# Altium PCB Deck Versal.PcbDoc
Units mm, origin at the board's own origin, x right, y up, seen from the top; angles counter-clockwise.
Board outline 314.32 x 139.7 mm, 2 copper layers (Top Layer, Bottom Layer); 181 components, 112 nets, 1109 pads, 0 vias.
Unrouted connection lines stored in the file: 21.
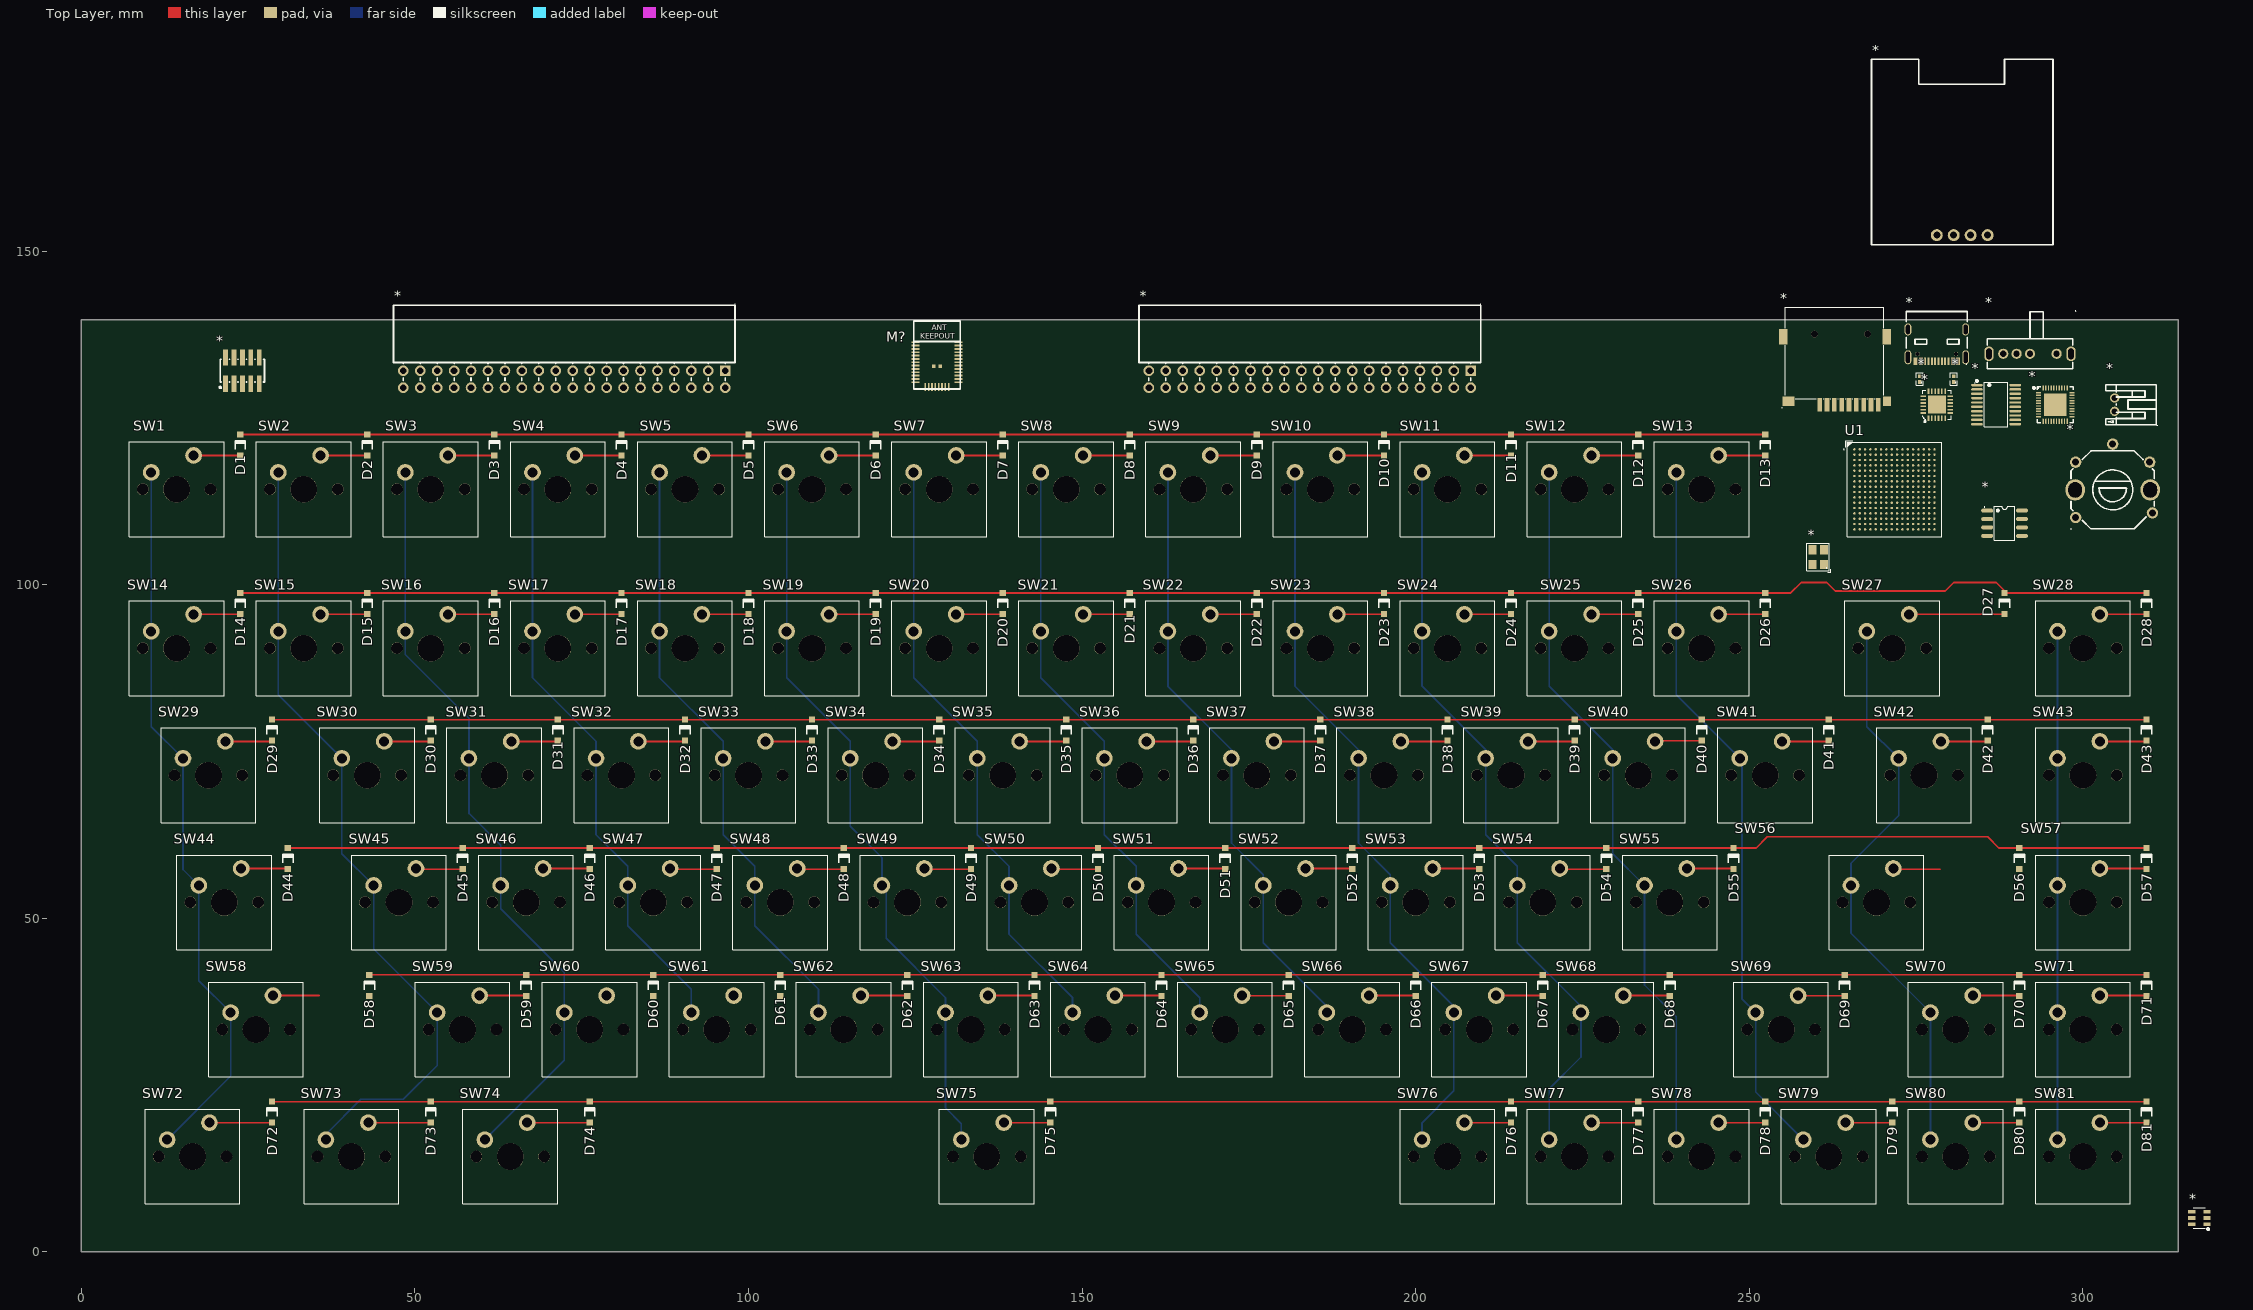
[diagram p0: Top Layer view]
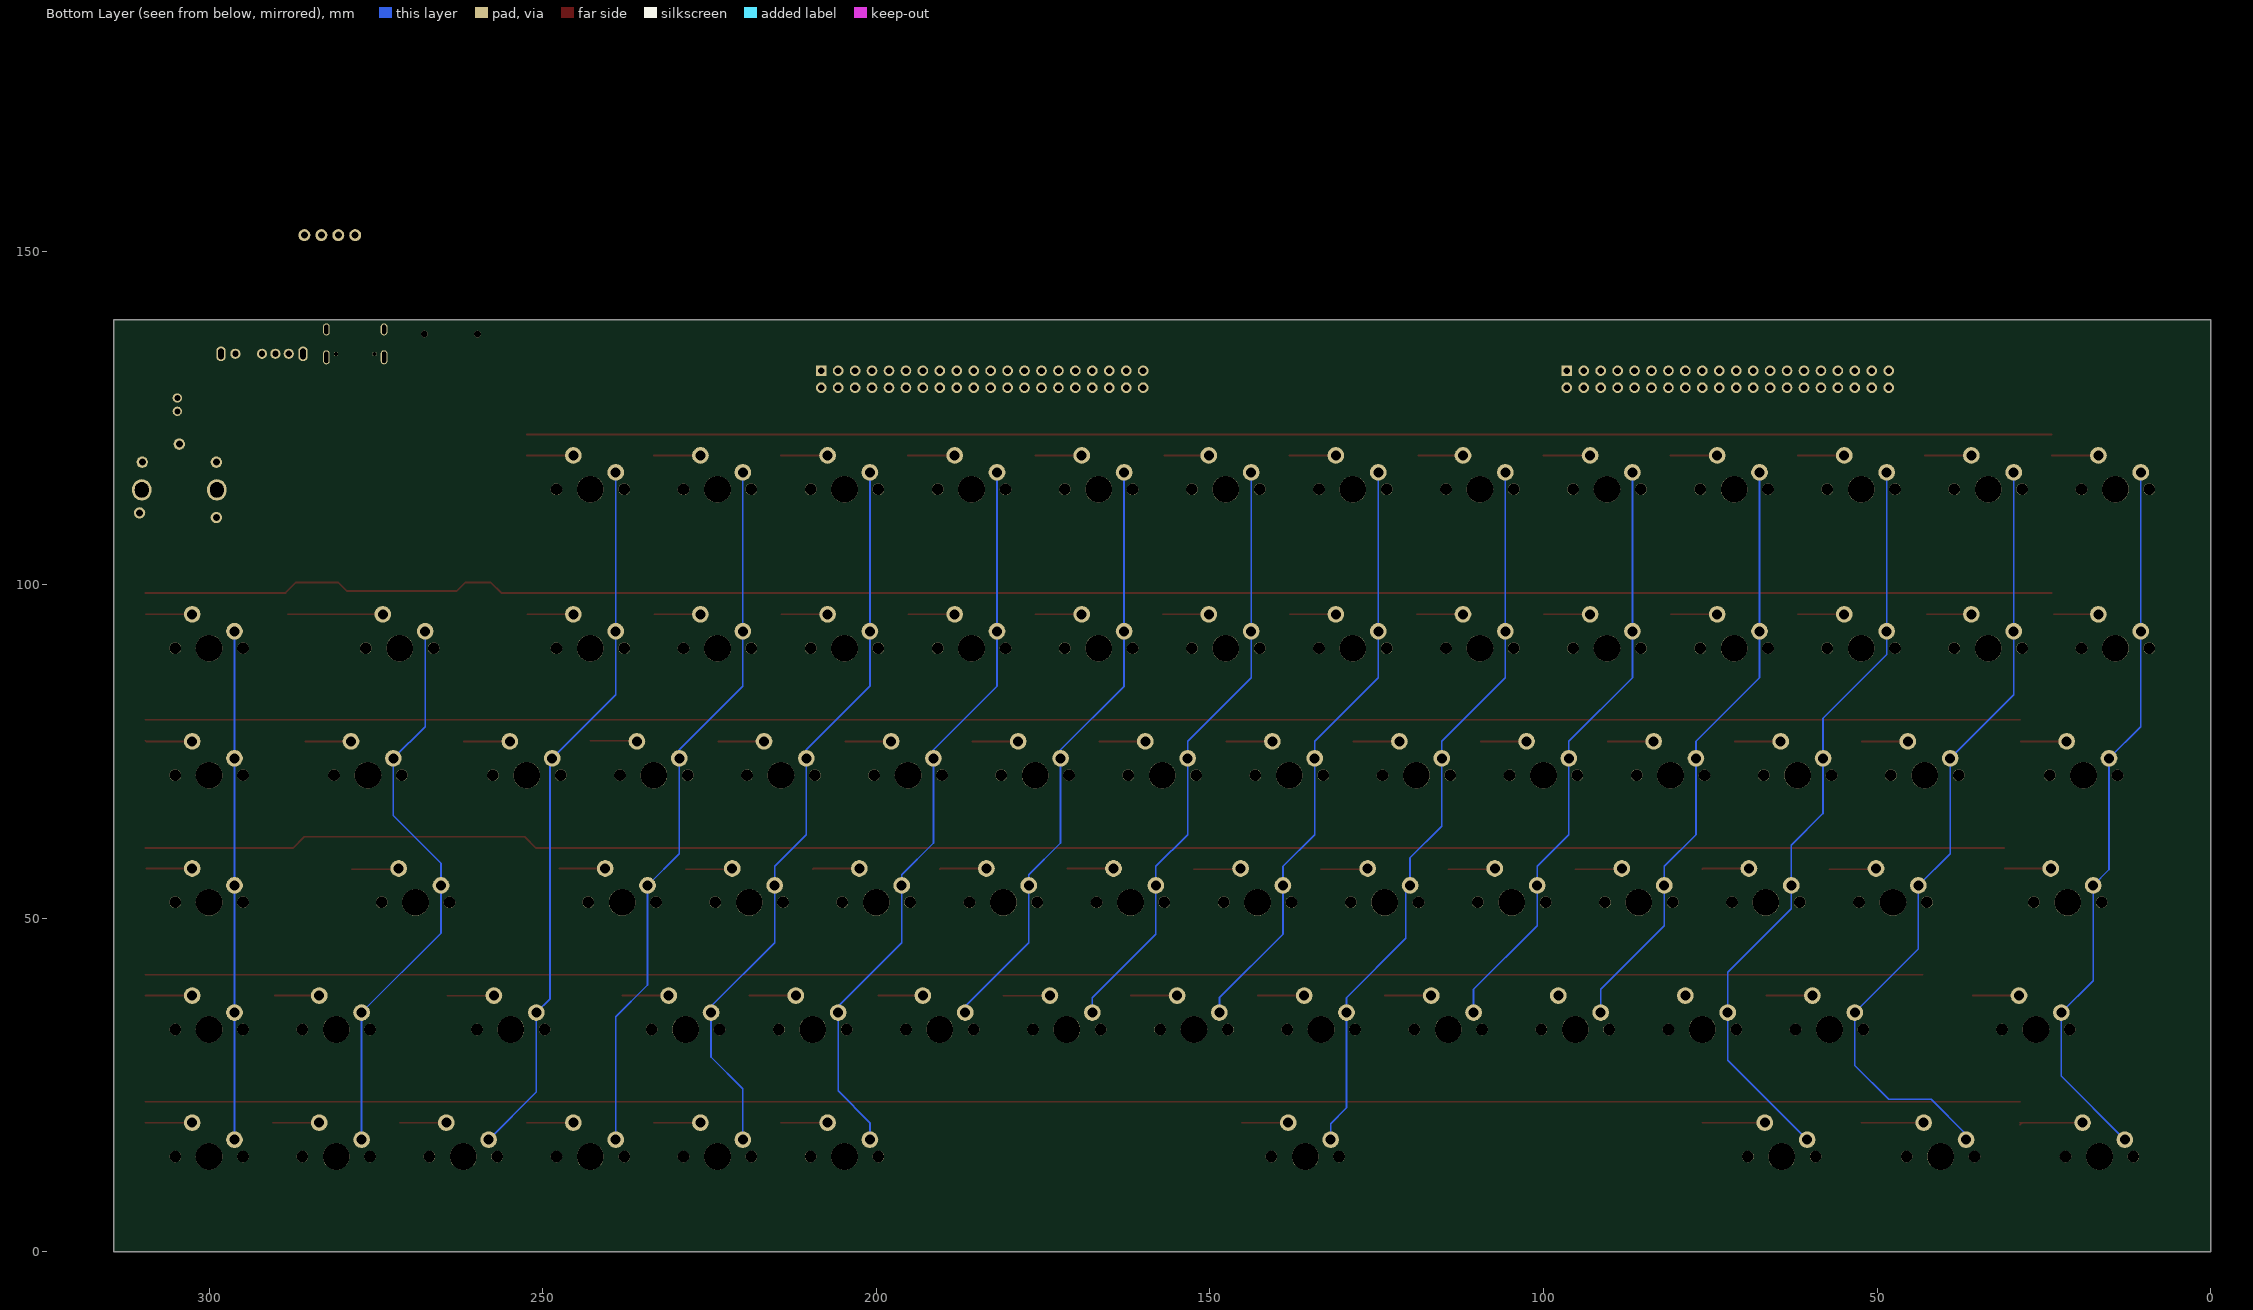
[diagram p1: Bottom Layer view, seen from below]

## Layer stack, top to bottom
Top Solder: solder mask 0.0102, Solder Resist, Dk 3.5
Top Layer: signal copper 0.0356
Dielectric 1: dielectric 0.32, FR-4, Dk 4.8
Bottom Layer: signal copper 0.0356
Bottom Solder: solder mask 0.0102, Solder Resist, Dk 3.5

## Board outline
0,0 314.325,0 314.325,139.7 0,139.7

## Design rules (kind name [scope] priority, off if disabled: settings)
Clearance [All] p1: gap=0.254 ignorepadtopadclearanceinfootprint=FALSE
PolygonConnect [All] p1: connectstyle=Relief reliefconductorwidth=0.254 reliefentries=4 polygonreliefangle="90 Angle" airgapwidth=0.254
RoutingVias [All] p1: holewidth=0.711 width=1.27 viastyle="Through Hole" minholewidth=0.711 minwidth=1.27 maxholewidth=0.711 maxwidth=1.27
SolderMaskExpansion [All] p1: expansion=0.102 istentingtop=FALSE
SupplyNets "Schematic Supply Nets_2" [InNet('VBUS')] p1: voltage=0.000
SupplyNets "Schematic Supply Nets_1" [InNet('GND')] p2: voltage=0.000
SupplyNets "Schematic Supply Nets" [InNet('VBUS_RAW')] p3: voltage=0.000
Width [All] p1: maxlimit=0.254 minlimit=0.254 preferedwidth=0.254
30 further rules are at their usual default settings.

## Classes and differential pairs
component class Memory: *
component class Power: *
component class Peripherals: * M?
component class "Deck Versal": * U1
component class USB: *
component class Keyboard: D1 D2 D3 D4 D5 D6 D7 D8 D9 D10 D11 D12 D13 D14 D15 D16 D17 D18 D19 D20 D21 D22 D23 D24 D25 D26 D27 D28 D29 D30 D31 D32 D33 D34 D35 D36 D37 D38 D39 D40 D41 D42 D43 D44 D45 D46 D47 D48 D49 D50 D51 D52 D53 D54 D55 D56 D57 D58 D59 D60 D61 D62 D63 D64 D65 D66 D67 D68 D69 D70 D71 D72 D73 D74 D75 D76 D77 D78 D79 D80 D81 SW1 SW2 SW3 SW4 SW5 SW6 SW7 SW8 SW9 SW10 SW11 SW12 SW13 SW14 SW15 SW16 SW17 SW18 SW19 SW20 SW21 SW22 SW23 SW24 SW25 SW26 SW27 SW28 SW29 SW30 SW31 SW32 SW33 SW34 SW35 SW36 SW37 SW38 SW39 SW40 SW41 SW42 SW43 SW44 SW45 SW46 SW47 SW48 SW49 SW50 SW51 SW52 SW53 SW54 SW55 SW56 SW57 SW58 SW59 SW60 SW61 SW62 SW63 SW64 SW65 SW66 SW67 SW68 SW69 SW70 SW71 SW72 SW73 SW74 SW75 SW76 SW77 SW78 SW79 SW80 SW81

## Components (designator, comment, footprint, x,y, rotation, side; value= is the part's Value field where it differs from the comment)
* "HS96L03W2C03" OLED-TH_L27.8-W27.2-P2.54_C9900033791 281.94,152.4 r180 top
* "USBLC6-2SC6" SOT-23-6_L2.9-W1.6-P0.95-LS2.8-BL 317.5,5.08 r90 top
* "0402WGF5101TCE" R0402 280.67,130.826 r90 top
* "0402WGF5101TCE" R0402 275.59,130.826 r90 top
* "ZX-PM2.54-2-20PWS" HDR-TH_40P-P2.54-H-F-R2-C20-S2.54-W8.5_1 72.39,130.81 r180 top
* "ZX-PM2.54-2-20PWS" HDR-TH_40P-P2.54-H-F-R2-C20-S2.54-W8.5_1 184.15,130.81 r180 top
* "X1321WVS-2X05J-C40D53" HDR-SMD_10P-P1.27-V-M-C2-C5-LS5.3 24.13,132.08 r0 top
* "SK13D07VG4" SW-TH_SK13D07VG4 292.1,134.62 r180 top
* "USB4105-GF-A-120" USB-C-SMD_MC-311D 278.13,135.89 r180 top
* "FE1.1S-BQFN24B" WQFN-24_L4.0-W4.0-P0.50-TL-EP2.7 278.13,127 r90 top
* "CH347T" TSSOP-20_L6.5-W4.4-P0.65-LS6.4-BL 287.02,127 r270 top
* "S2B-PH-K-S-GW" CONN-TH_S2B-PH-K-S-GW 304.8,127 r270 top
* "AXP2101" QFN-40_L5.0-W5.0-P0.40-TL-EP3.4 295.887,127 r0 top
* "EC12D1524403" SW-TH_EC12D1524403 304.663,115.57 r0 top
* "TF-015" TF-SMD_TF-015 262.89,132.08 r180 top
* "APS6404L-3SQR-SN_C5333729" SOIC-8_L4.9-W3.9-P1.27-LS6.0-BL 288.29,109.22 r270 top
* "1532H4-12000JWPDTSNL" OSC-SMD_4P-L3.2-W2.5-BL 260.35,104.14 r90 top
D1 "1N4148W-7-F" DIOD-SOD123-2_V 23.812,120.95 r90 top
D2 "1N4148W-7-F" DIOD-SOD123-2_V 42.862,120.95 r90 top
D3 "1N4148W-7-F" DIOD-SOD123-2_V 61.912,120.95 r90 top
D4 "1N4148W-7-F" DIOD-SOD123-2_V 80.962,120.95 r90 top
D5 "1N4148W-7-F" DIOD-SOD123-2_V 100.013,120.95 r90 top
D6 "1N4148W-7-F" DIOD-SOD123-2_V 119.062,120.95 r90 top
D7 "1N4148W-7-F" DIOD-SOD123-2_V 138.112,120.95 r90 top
D8 "1N4148W-7-F" DIOD-SOD123-2_V 157.162,120.95 r90 top
D9 "1N4148W-7-F" DIOD-SOD123-2_V 176.213,120.95 r90 top
D10 "1N4148W-7-F" DIOD-SOD123-2_V 195.262,120.95 r90 top
D11 "1N4148W-7-F" DIOD-SOD123-2_V 214.312,120.95 r90 top
D12 "1N4148W-7-F" DIOD-SOD123-2_V 233.362,120.95 r90 top
D13 "1N4148W-7-F" DIOD-SOD123-2_V 252.412,120.95 r90 top
D14 "1N4148W-7-F" DIOD-SOD123-2_V 23.812,97.2 r90 top
D15 "1N4148W-7-F" DIOD-SOD123-2_V 42.862,97.2 r90 top
D16 "1N4148W-7-F" DIOD-SOD123-2_V 61.912,97.2 r90 top
D17 "1N4148W-7-F" DIOD-SOD123-2_V 80.962,97.2 r90 top
D18 "1N4148W-7-F" DIOD-SOD123-2_V 100.013,97.2 r90 top
D19 "1N4148W-7-F" DIOD-SOD123-2_V 119.062,97.2 r90 top
D20 "1N4148W-7-F" DIOD-SOD123-2_V 138.112,97.2 r90 top
D21 "1N4148W-7-F" DIOD-SOD123-2_V 157.162,97.2 r90 top
D22 "1N4148W-7-F" DIOD-SOD123-2_V 176.213,97.2 r90 top
D23 "1N4148W-7-F" DIOD-SOD123-2_V 195.262,97.2 r90 top
D24 "1N4148W-7-F" DIOD-SOD123-2_V 214.312,97.2 r90 top
D25 "1N4148W-7-F" DIOD-SOD123-2_V 233.362,97.2 r90 top
D26 "1N4148W-7-F" DIOD-SOD123-2_V 252.412,97.2 r90 top
D27 "1N4148W-7-F" DIOD-SOD123-2_V 288.29,97.2 r90 top
D28 "1N4148W-7-F" DIOD-SOD123-2_V 309.562,97.2 r90 top
D29 "1N4148W-7-F" DIOD-SOD123-2_V 28.575,78.2 r90 top
D30 "1N4148W-7-F" DIOD-SOD123-2_V 52.387,78.2 r90 top
D31 "1N4148W-7-F" DIOD-SOD123-2_V 71.438,78.2 r90 top
D32 "1N4148W-7-F" DIOD-SOD123-2_V 90.487,78.2 r90 top
D33 "1N4148W-7-F" DIOD-SOD123-2_V 109.537,78.2 r90 top
D34 "1N4148W-7-F" DIOD-SOD123-2_V 128.588,78.2 r90 top
D35 "1N4148W-7-F" DIOD-SOD123-2_V 147.637,78.2 r90 top
D36 "1N4148W-7-F" DIOD-SOD123-2_V 166.688,78.2 r90 top
D37 "1N4148W-7-F" DIOD-SOD123-2_V 185.737,78.2 r90 top
D38 "1N4148W-7-F" DIOD-SOD123-2_V 204.787,78.2 r90 top
D39 "1N4148W-7-F" DIOD-SOD123-2_V 223.837,78.2 r90 top
D40 "1N4148W-7-F" DIOD-SOD123-2_V 242.887,78.2 r90 top
D41 "1N4148W-7-F" DIOD-SOD123-2_V 261.938,78.2 r90 top
D42 "1N4148W-7-F" DIOD-SOD123-2_V 285.75,78.2 r90 top
D43 "1N4148W-7-F" DIOD-SOD123-2_V 309.562,78.2 r90 top
D44 "1N4148W-7-F" DIOD-SOD123-2_V 30.956,58.95 r90 top
D45 "1N4148W-7-F" DIOD-SOD123-2_V 57.15,58.95 r90 top
D46 "1N4148W-7-F" DIOD-SOD123-2_V 76.2,58.95 r90 top
D47 "1N4148W-7-F" DIOD-SOD123-2_V 95.25,58.95 r90 top
D48 "1N4148W-7-F" DIOD-SOD123-2_V 114.3,58.95 r90 top
D49 "1N4148W-7-F" DIOD-SOD123-2_V 133.35,58.95 r90 top
D50 "1N4148W-7-F" DIOD-SOD123-2_V 152.4,58.95 r90 top
D51 "1N4148W-7-F" DIOD-SOD123-2_V 171.45,58.95 r90 top
D52 "1N4148W-7-F" DIOD-SOD123-2_V 190.5,58.95 r90 top
D53 "1N4148W-7-F" DIOD-SOD123-2_V 209.55,58.95 r90 top
D54 "1N4148W-7-F" DIOD-SOD123-2_V 228.6,58.95 r90 top
D55 "1N4148W-7-F" DIOD-SOD123-2_V 247.65,58.95 r90 top
D56 "1N4148W-7-F" DIOD-SOD123-2_V 290.514,58.95 r90 top
D57 "1N4148W-7-F" DIOD-SOD123-2_V 309.562,58.95 r90 top
D58 "1N4148W-7-F" DIOD-SOD123-2_V 43.18,39.95 r90 top
D59 "1N4148W-7-F" DIOD-SOD123-2_V 66.675,39.95 r90 top
D60 "1N4148W-7-F" DIOD-SOD123-2_V 85.725,39.95 r90 top
D61 "1N4148W-7-F" DIOD-SOD123-2_V 104.775,39.95 r90 top
D62 "1N4148W-7-F" DIOD-SOD123-2_V 123.825,39.95 r90 top
D63 "1N4148W-7-F" DIOD-SOD123-2_V 142.875,39.95 r90 top
D64 "1N4148W-7-F" DIOD-SOD123-2_V 161.925,39.95 r90 top
D65 "1N4148W-7-F" DIOD-SOD123-2_V 180.975,39.95 r90 top
D66 "1N4148W-7-F" DIOD-SOD123-2_V 200.025,39.95 r90 top
D67 "1N4148W-7-F" DIOD-SOD123-2_V 219.075,39.95 r90 top
D68 "1N4148W-7-F" DIOD-SOD123-2_V 238.125,39.95 r90 top
D69 "1N4148W-7-F" DIOD-SOD123-2_V 264.319,39.95 r90 top
D70 "1N4148W-7-F" DIOD-SOD123-2_V 290.512,39.95 r90 top
D71 "1N4148W-7-F" DIOD-SOD123-2_V 309.562,39.95 r90 top
D72 "1N4148W-7-F" DIOD-SOD123-2_V 28.575,20.95 r90 top
D73 "1N4148W-7-F" DIOD-SOD123-2_V 52.387,20.95 r90 top
D74 "1N4148W-7-F" DIOD-SOD123-2_V 76.2,20.95 r90 top
D75 "1N4148W-7-F" DIOD-SOD123-2_V 145.256,20.95 r90 top
D76 "1N4148W-7-F" DIOD-SOD123-2_V 214.312,20.95 r90 top
D77 "1N4148W-7-F" DIOD-SOD123-2_V 233.362,20.95 r90 top
D78 "1N4148W-7-F" DIOD-SOD123-2_V 252.412,20.95 r90 top
D79 "1N4148W-7-F" DIOD-SOD123-2_V 271.462,20.95 r90 top
D80 "1N4148W-7-F" DIOD-SOD123-2_V 290.512,20.95 r90 top
D81 "1N4148W-7-F" DIOD-SOD123-2_V 309.562,20.95 r90 top
M? "BLYSTL15" BLYSTL15 128.27,133.35 r270 top
SW1 "Outemu_Switch" SW_Cherry_MX_PCB_1.00u 14.287,114.3 r0 top
SW2 "Outemu_Switch" SW_Cherry_MX_PCB_1.00u 33.337,114.3 r0 top
SW3 "Outemu_Switch" SW_Cherry_MX_PCB_1.00u 52.387,114.3 r0 top
SW4 "Outemu_Switch" SW_Cherry_MX_PCB_1.00u 71.438,114.3 r0 top
SW5 "Outemu_Switch" SW_Cherry_MX_PCB_1.00u 90.487,114.3 r0 top
SW6 "Outemu_Switch" SW_Cherry_MX_PCB_1.00u 109.537,114.3 r0 top
SW7 "Outemu_Switch" SW_Cherry_MX_PCB_1.00u 128.588,114.3 r0 top
SW8 "Outemu_Switch" SW_Cherry_MX_PCB_1.00u 147.637,114.3 r0 top
SW9 "Outemu_Switch" SW_Cherry_MX_PCB_1.00u 166.688,114.3 r0 top
SW10 "Outemu_Switch" SW_Cherry_MX_PCB_1.00u 185.737,114.3 r0 top
SW11 "Outemu_Switch" SW_Cherry_MX_PCB_1.00u 204.787,114.3 r0 top
SW12 "Outemu_Switch" SW_Cherry_MX_PCB_1.00u 223.837,114.3 r0 top
SW13 "Outemu_Switch" SW_Cherry_MX_PCB_1.00u 242.887,114.3 r0 top
SW14 "Outemu_Switch" SW_Cherry_MX_PCB_1.00u 14.287,90.487 r0 top
SW15 "Outemu_Switch" SW_Cherry_MX_PCB_1.00u 33.337,90.487 r0 top
SW16 "Outemu_Switch" SW_Cherry_MX_PCB_1.00u 52.387,90.487 r0 top
SW17 "Outemu_Switch" SW_Cherry_MX_PCB_1.00u 71.438,90.487 r0 top
SW18 "Outemu_Switch" SW_Cherry_MX_PCB_1.00u 90.487,90.487 r0 top
SW19 "Outemu_Switch" SW_Cherry_MX_PCB_1.00u 109.537,90.487 r0 top
SW20 "Outemu_Switch" SW_Cherry_MX_PCB_1.00u 128.588,90.487 r0 top
SW21 "Outemu_Switch" SW_Cherry_MX_PCB_1.00u 147.637,90.487 r0 top
SW22 "Outemu_Switch" SW_Cherry_MX_PCB_1.00u 166.688,90.487 r0 top
SW23 "Outemu_Switch" SW_Cherry_MX_PCB_1.00u 185.737,90.487 r0 top
SW24 "Outemu_Switch" SW_Cherry_MX_PCB_1.00u 204.787,90.487 r0 top
SW25 "Outemu_Switch" SW_Cherry_MX_PCB_1.00u 223.837,90.487 r0 top
SW26 "Outemu_Switch" SW_Cherry_MX_PCB_1.00u 242.887,90.487 r0 top
SW27 "Outemu_Switch" SW_Cherry_MX_PCB_1.00u 271.462,90.487 r0 top
SW28 "Outemu_Switch" SW_Cherry_MX_PCB_1.00u 300.037,90.487 r0 top
SW29 "Outemu_Switch" SW_Cherry_MX_PCB_1.00u 19.05,71.438 r0 top
SW30 "Outemu_Switch" SW_Cherry_MX_PCB_1.00u 42.862,71.438 r0 top
SW31 "Outemu_Switch" SW_Cherry_MX_PCB_1.00u 61.912,71.438 r0 top
SW32 "Outemu_Switch" SW_Cherry_MX_PCB_1.00u 80.962,71.438 r0 top
SW33 "Outemu_Switch" SW_Cherry_MX_PCB_1.00u 100.013,71.438 r0 top
SW34 "Outemu_Switch" SW_Cherry_MX_PCB_1.00u 119.062,71.438 r0 top
SW35 "Outemu_Switch" SW_Cherry_MX_PCB_1.00u 138.112,71.438 r0 top
SW36 "Outemu_Switch" SW_Cherry_MX_PCB_1.00u 157.162,71.438 r0 top
SW37 "Outemu_Switch" SW_Cherry_MX_PCB_1.00u 176.213,71.438 r0 top
SW38 "Outemu_Switch" SW_Cherry_MX_PCB_1.00u 195.262,71.438 r0 top
SW39 "Outemu_Switch" SW_Cherry_MX_PCB_1.00u 214.312,71.438 r0 top
SW40 "Outemu_Switch" SW_Cherry_MX_PCB_1.00u 233.362,71.438 r0 top
SW41 "Outemu_Switch" SW_Cherry_MX_PCB_1.00u 252.412,71.438 r0 top
SW42 "Outemu_Switch" SW_Cherry_MX_PCB_1.00u 276.225,71.438 r0 top
SW43 "Outemu_Switch" SW_Cherry_MX_PCB_1.00u 300.037,71.438 r0 top
SW44 "Outemu_Switch" SW_Cherry_MX_PCB_1.00u 21.431,52.387 r0 top
SW45 "Outemu_Switch" SW_Cherry_MX_PCB_1.00u 47.625,52.387 r0 top
SW46 "Outemu_Switch" SW_Cherry_MX_PCB_1.00u 66.675,52.387 r0 top
SW47 "Outemu_Switch" SW_Cherry_MX_PCB_1.00u 85.725,52.387 r0 top
SW48 "Outemu_Switch" SW_Cherry_MX_PCB_1.00u 104.775,52.387 r0 top
SW49 "Outemu_Switch" SW_Cherry_MX_PCB_1.00u 123.825,52.387 r0 top
SW50 "Outemu_Switch" SW_Cherry_MX_PCB_1.00u 142.875,52.387 r0 top
SW51 "Outemu_Switch" SW_Cherry_MX_PCB_1.00u 161.925,52.387 r0 top
SW52 "Outemu_Switch" SW_Cherry_MX_PCB_1.00u 180.975,52.387 r0 top
SW53 "Outemu_Switch" SW_Cherry_MX_PCB_1.00u 200.025,52.387 r0 top
SW54 "Outemu_Switch" SW_Cherry_MX_PCB_1.00u 219.075,52.387 r0 top
SW55 "Outemu_Switch" SW_Cherry_MX_PCB_1.00u 238.125,52.387 r0 top
SW56 "Outemu_Switch" SW_Cherry_MX_PCB_1.00u 269.081,52.387 r0 top
SW57 "Outemu_Switch" SW_Cherry_MX_PCB_1.00u 300.037,52.387 r0 top
SW58 "Outemu_Switch" SW_Cherry_MX_PCB_1.00u 26.194,33.337 r0 top
SW59 "Outemu_Switch" SW_Cherry_MX_PCB_1.00u 57.15,33.337 r0 top
SW60 "Outemu_Switch" SW_Cherry_MX_PCB_1.00u 76.2,33.337 r0 top
SW61 "Outemu_Switch" SW_Cherry_MX_PCB_1.00u 95.25,33.337 r0 top
SW62 "Outemu_Switch" SW_Cherry_MX_PCB_1.00u 114.3,33.337 r0 top
SW63 "Outemu_Switch" SW_Cherry_MX_PCB_1.00u 133.35,33.337 r0 top
SW64 "Outemu_Switch" SW_Cherry_MX_PCB_1.00u 152.4,33.337 r0 top
SW65 "Outemu_Switch" SW_Cherry_MX_PCB_1.00u 171.45,33.337 r0 top
SW66 "Outemu_Switch" SW_Cherry_MX_PCB_1.00u 190.5,33.337 r0 top
SW67 "Outemu_Switch" SW_Cherry_MX_PCB_1.00u 209.55,33.337 r0 top
SW68 "Outemu_Switch" SW_Cherry_MX_PCB_1.00u 228.6,33.337 r0 top
SW69 "Outemu_Switch" SW_Cherry_MX_PCB_1.00u 254.794,33.337 r0 top
SW70 "Outemu_Switch" SW_Cherry_MX_PCB_1.00u 280.988,33.337 r0 top
SW71 "Outemu_Switch" SW_Cherry_MX_PCB_1.00u 300.037,33.337 r0 top
SW72 "Outemu_Switch" SW_Cherry_MX_PCB_1.00u 16.669,14.287 r0 top
SW73 "Outemu_Switch" SW_Cherry_MX_PCB_1.00u 40.481,14.287 r0 top
SW74 "Outemu_Switch" SW_Cherry_MX_PCB_1.00u 64.294,14.287 r0 top
SW75 "Outemu_Switch" SW_Cherry_MX_PCB_1.00u 135.731,14.287 r0 top
SW76 "Outemu_Switch" SW_Cherry_MX_PCB_1.00u 204.787,14.287 r0 top
SW77 "Outemu_Switch" SW_Cherry_MX_PCB_1.00u 223.837,14.287 r0 top
SW78 "Outemu_Switch" SW_Cherry_MX_PCB_1.00u 242.887,14.287 r0 top
SW79 "Outemu_Switch" SW_Cherry_MX_PCB_1.00u 261.938,14.287 r0 top
SW80 "Outemu_Switch" SW_Cherry_MX_PCB_1.00u 280.988,14.287 r0 top
SW81 "Outemu_Switch" SW_Cherry_MX_PCB_1.00u 300.037,14.287 r0 top
U1 "LFE5U-25F-6BG256C_Separated" CABGA-256_L14.0-W14.0-R16-C16-P0.80-TL 271.78,114.3 r0 top

## Footprints (in the part's own frame and the unit in brackets; to place one, negate y for a bottom-side part, rotate by r counter-clockwise, add the part's x,y. Pads: shape width x height; smd on the part's side, far side on the other; paste and mask are expansions set on the pad)
BLYSTL15 [mm] "nRF54L15 Bluetooth LE Module"
  rect 0.26x1.2 smd: 1(-3,-3.2) 2(-2.5,-3.2) 3(-2,-3.2) 4(-1.5,-3.2) 5(-1,-3.2) 6(-0.5,-3.2) 7(0,-3.2) 8(0.5,-3.2) 9(1,-3.2) 10(1.5,-3.2) 11(2,-3.2) 12(2.5,-3.2) 13(3,-3.2) 22(3,3.2) 23(2.5,3.2) 24(2,3.2) 25(1.5,3.2) 26(1,3.2) 27(0.5,3.2) 28(0,3.2) 29(-0.5,3.2) 30(-1,3.2) 31(-1.5,3.2) 32(-2,3.2) 33(-2.5,3.2) 34(-3,3.2)
  rect 1.2x0.26 smd: 14(3.7,-1.75) 15(3.7,-1.25) 16(3.7,-0.75) 17(3.7,-0.25) 18(3.7,0.25) 19(3.7,0.75) 20(3.7,1.25) 21(3.7,1.75)
  rect 0.5x0.5 smd: 35(0.6,-0.5) 36(0.6,0.5)
  Multi-Layer pour cut-out: -6.2,3.475 -3.1,3.475 -3.1,-3.5 -6.175,-3.5 -6.2,-3.525
  silkscreen extent -6.2,-3.5 4,3.5, body extent -6.33,-3.63 4.13,3.63, height 1.6
CABGA-256_L14.0-W14.0-R16-C16-P0.80-TL [mm]
  round 0.36 smd: A1(-6,6) A2(-5.2,6) A3(-4.4,6) A4(-3.6,6) A5(-2.8,6) A6(-2,6) A7(-1.2,6) A8(-0.4,6) A9(0.4,6) A10(1.2,6) A11(2,6) A12(2.8,6) A13(3.6,6) A14(4.4,6) A15(5.2,6) A16(6,6) B1(-6,5.2) B2(-5.2,5.2) B3(-4.4,5.2) B4(-3.6,5.2) B5(-2.8,5.2) B6(-2,5.2) B7(-1.2,5.2) B8(-0.4,5.2) B9(0.4,5.2) B10(1.2,5.2) B11(2,5.2) B12(2.8,5.2) B13(3.6,5.2) B14(4.4,5.2) B15(5.2,5.2) B16(6,5.2) C1(-6,4.4) C2(-5.2,4.4) C3(-4.4,4.4) C4(-3.6,4.4) C5(-2.8,4.4) C6(-2,4.4) C7(-1.2,4.4) C8(-0.4,4.4) C9(0.4,4.4) C10(1.2,4.4) C11(2,4.4) C12(2.8,4.4) C13(3.6,4.4) C14(4.4,4.4) C15(5.2,4.4) C16(6,4.4) D1(-6,3.6) D2(-5.2,3.6) D3(-4.4,3.6) D4(-3.6,3.6) D5(-2.8,3.6) D6(-2,3.6) D7(-1.2,3.6) D8(-0.4,3.6) D9(0.4,3.6) D10(1.2,3.6) D11(2,3.6) D12(2.8,3.6) D13(3.6,3.6) D14(4.4,3.6) D15(5.2,3.6) D16(6,3.6) E1(-6,2.8) E2(-5.2,2.8) E3(-4.4,2.8) E4(-3.6,2.8) E5(-2.8,2.8) E6(-2,2.8) E7(-1.2,2.8) E8(-0.4,2.8) E9(0.4,2.8) E10(1.2,2.8) E11(2,2.8) E12(2.8,2.8) E13(3.6,2.8) E14(4.4,2.8) E15(5.2,2.8) E16(6,2.8) F1(-6,2) F2(-5.2,2) F3(-4.4,2) F4(-3.6,2) F5(-2.8,2) F6(-2,2) F7(-1.2,2) F8(-0.4,2) F9(0.4,2) F10(1.2,2) F11(2,2) F12(2.8,2) F13(3.6,2) F14(4.4,2) F15(5.2,2) F16(6,2) G1(-6,1.2) G2(-5.2,1.2) G3(-4.4,1.2) G4(-3.6,1.2) G5(-2.8,1.2) G6(-2,1.2) G7(-1.2,1.2) G8(-0.4,1.2) G9(0.4,1.2) G10(1.2,1.2) G11(2,1.2) G12(2.8,1.2) G13(3.6,1.2) G14(4.4,1.2) G15(5.2,1.2) G16(6,1.2) H1(-6,0.4) H2(-5.2,0.4) H3(-4.4,0.4) H4(-3.6,0.4) H5(-2.8,0.4) H6(-2,0.4) H7(-1.2,0.4) H8(-0.4,0.4) H9(0.4,0.4) H10(1.2,0.4) H11(2,0.4) H12(2.8,0.4) H13(3.6,0.4) H14(4.4,0.4) H15(5.2,0.4) H16(6,0.4) J1(-6,-0.4) J2(-5.2,-0.4) J3(-4.4,-0.4) J4(-3.6,-0.4) J5(-2.8,-0.4) J6(-2,-0.4) J7(-1.2,-0.4) J8(-0.4,-0.4) J9(0.4,-0.4) J10(1.2,-0.4) J11(2,-0.4) J12(2.8,-0.4) J13(3.6,-0.4) J14(4.4,-0.4) J15(5.2,-0.4) J16(6,-0.4) K1(-6,-1.2) K2(-5.2,-1.2) K3(-4.4,-1.2) K4(-3.6,-1.2) K5(-2.8,-1.2) K6(-2,-1.2) K7(-1.2,-1.2) K8(-0.4,-1.2) K9(0.4,-1.2) K10(1.2,-1.2) K11(2,-1.2) K12(2.8,-1.2) K13(3.6,-1.2) K14(4.4,-1.2) K15(5.2,-1.2) K16(6,-1.2) L1(-6,-2) L2(-5.2,-2) L3(-4.4,-2) L4(-3.6,-2) L5(-2.8,-2) L6(-2,-2) L7(-1.2,-2) L8(-0.4,-2) L9(0.4,-2) L10(1.2,-2) L11(2,-2) L12(2.8,-2) L13(3.6,-2) L14(4.4,-2) L15(5.2,-2) L16(6,-2) M1(-6,-2.8) M2(-5.2,-2.8) M3(-4.4,-2.8) M4(-3.6,-2.8) M5(-2.8,-2.8) M6(-2,-2.8) M7(-1.2,-2.8) M8(-0.4,-2.8) M9(0.4,-2.8) M10(1.2,-2.8) M11(2,-2.8) M12(2.8,-2.8) M13(3.6,-2.8) M14(4.4,-2.8) M15(5.2,-2.8) M16(6,-2.8) N1(-6,-3.6) N2(-5.2,-3.6) N3(-4.4,-3.6) N4(-3.6,-3.6) N5(-2.8,-3.6) N6(-2,-3.6) N7(-1.2,-3.6) N8(-0.4,-3.6) N9(0.4,-3.6) N10(1.2,-3.6) N11(2,-3.6) N12(2.8,-3.6) N13(3.6,-3.6) N14(4.4,-3.6) N15(5.2,-3.6) N16(6,-3.6) P1(-6,-4.4) P2(-5.2,-4.4) P3(-4.4,-4.4) P4(-3.6,-4.4) P5(-2.8,-4.4) P6(-2,-4.4) P7(-1.2,-4.4) P8(-0.4,-4.4) P9(0.4,-4.4) P10(1.2,-4.4) P11(2,-4.4) P12(2.8,-4.4) P13(3.6,-4.4) P14(4.4,-4.4) P15(5.2,-4.4) P16(6,-4.4) R1(-6,-5.2) R2(-5.2,-5.2) R3(-4.4,-5.2) R4(-3.6,-5.2) R5(-2.8,-5.2) R6(-2,-5.2) R7(-1.2,-5.2) R8(-0.4,-5.2) R9(0.4,-5.2) R10(1.2,-5.2) R11(2,-5.2) R12(2.8,-5.2) R13(3.6,-5.2) R14(4.4,-5.2) R15(5.2,-5.2) R16(6,-5.2) T1(-6,-6) T2(-5.2,-6) T3(-4.4,-6) T4(-3.6,-6) T5(-2.8,-6) T6(-2,-6) T7(-1.2,-6) T8(-0.4,-6) T9(0.4,-6) T10(1.2,-6) T11(2,-6) T12(2.8,-6) T13(3.6,-6) T14(4.4,-6) T15(5.2,-6) T16(6,-6)
  silkscreen extent -7.63,-7.08 7.08,7.3, body extent -7,-7 7,7, height 1.31
CONN-TH_S2B-PH-K-S-GW [mm]
  round 1.4 hole 0.9: 1(1,0) 2(-1,0)
  silkscreen extent -3,-1.35 3.16,6.41, body extent -2.95,-1.35 2.95,6.25, height 4.8
DIOD-SOD123-2_V [mm] "SOD123, 2-Leads, Body 2.7x1.55mm, Height 1.45mm"
  rect 0.9x0.95 smd: 1(-1.575,0) 2(1.575,0)
  silkscreen extent -0.64,-0.83 0.64,0.77, body extent -1.35,-0.77 1.35,0.77, height 1.45
HDR-SMD_10P-P1.27-V-M-C2-C5-LS5.3 [mm]
  rect 0.74x2.4 smd: 1(-2.54,-1.95) 2(-2.54,1.95) 3(-1.27,-1.95) 4(-1.27,1.95) 5(0,-1.95) 6(0,1.95) 7(1.27,-1.95) 8(1.27,1.95) 9(2.54,-1.95) 10(2.54,1.95)
  silkscreen extent -3.47,-2.67 3.33,1.7, body extent -3.17,-2.65 3.18,2.65, height 5
HDR-TH_40P-P2.54-H-F-R2-C20-S2.54-W8.5_1 [mm]
  rect 1.6x1.6 hole 1.02: 1(-24.13,-1.27)
  round 1.6 hole 1.02: 2(-24.13,1.27) 3(-21.59,-1.27) 4(-21.59,1.27) 5(-19.05,-1.27) 6(-19.05,1.27) 7(-16.51,-1.27) 8(-16.51,1.27) 9(-13.97,-1.27) 10(-13.97,1.27) 11(-11.43,-1.27) 12(-11.43,1.27) 13(-8.89,-1.27) 14(-8.89,1.27) 15(-6.35,-1.27) 16(-6.35,1.27) 17(-3.81,-1.27) 18(-3.81,1.27) 19(-1.27,-1.27) 20(-1.27,1.27) 21(1.27,-1.27) 22(1.27,1.27) 23(3.81,-1.27) 24(3.81,1.27) 25(6.35,-1.27) 26(6.35,1.27) 27(8.89,-1.27) 28(8.89,1.27) 29(11.43,-1.27) 30(11.43,1.27) 31(13.97,-1.27) 32(13.97,1.27) 33(16.51,-1.27) 34(16.51,1.27) 35(19.05,-1.27) 36(19.05,1.27) 37(21.59,-1.27) 38(21.59,1.27) 39(24.13,-1.27) 40(24.13,1.27)
  silkscreen extent -25.63,-11.26 25.6,0.24, body extent -25.6,-11.25 25.6,1.45, height 5.01
OLED-TH_L27.8-W27.2-P2.54_C9900033791 [mm]
  round 1.8 hole 1.05: 1(-3.81,0) 2(-1.27,0) 3(1.27,0) 4(3.81,0)
  silkscreen extent -13.63,-26.36 13.6,1.44, body extent -13.47,-26.35 13.73,1.45, height 5.5
OSC-SMD_4P-L3.2-W2.5-BL [mm]
  rect 1.4x1.2 smd: 1(-1.1,-0.88) 2(1.1,-0.88) 3(1.1,0.88) 4(-1.1,0.88)
  silkscreen extent -2.29,-1.9 2.07,1.72, body extent -1.6,-1.25 1.6,1.25, height 0.8
QFN-40_L5.0-W5.0-P0.40-TL-EP3.4 [mm]
  rrect100% 0.8x0.2 smd: 1(-2.5,1.8) 2(-2.5,1.4) 3(-2.5,1) 4(-2.5,0.6) 5(-2.5,0.2) 6(-2.5,-0.2) 7(-2.5,-0.6) 8(-2.5,-1) 9(-2.5,-1.4) 10(-2.5,-1.8) 21(2.5,-1.8) 22(2.5,-1.4) 23(2.5,-1) 24(2.5,-0.6) 25(2.5,-0.2) 26(2.5,0.2) 27(2.5,0.6) 28(2.5,1) 29(2.5,1.4) 30(2.5,1.8)
  rrect100% 0.2x0.8 smd: 11(-1.8,-2.5) 12(-1.4,-2.5) 13(-1,-2.5) 14(-0.6,-2.5) 15(-0.2,-2.5) 16(0.2,-2.5) 17(0.6,-2.5) 18(1,-2.5) 19(1.4,-2.5) 20(1.8,-2.5) 31(1.8,2.5) 32(1.4,2.5) 33(1,2.5) 34(0.6,2.5) 35(0.2,2.5) 36(-0.2,2.5) 37(-0.6,2.5) 38(-1,2.5) 39(-1.4,2.5) 40(-1.8,2.5)
  rect 3.4x3.4 smd: 41(0,0)
  silkscreen extent -3.35,-2.7 2.7,2.7, body extent -2.5,-2.5 2.5,2.5, height 0.85
R0402 [mm]
  rect 0.566x0.54 smd: 1(-0.43,0) 2(0.43,0)
  silkscreen extent -0.94,-0.5 0.94,0.5, body extent -0.5,-0.25 0.5,0.25, height 0.36
SOIC-8_L4.9-W3.9-P1.27-LS6.0-BL [mm]
  rrect100% 0.588x1.8 smd: 1(-1.9,-2.6) 2(-0.63,-2.6) 3(0.63,-2.6) 4(1.9,-2.6) 5(1.9,2.6) 6(0.63,2.6) 7(-0.63,2.6) 8(-1.9,2.6)
  silkscreen extent -2.53,-3.03 2.53,1.52, body extent -2.45,-3 2.45,3, height 1.7
SOT-23-6_L2.9-W1.6-P0.95-LS2.8-BL [mm]
  rect 0.532x1.072 smd: 1(-0.95,-1.15) 2(0,-1.15) 3(0.95,-1.15) 4(0.95,1.15) 5(0,1.15) 6(-0.95,1.15)
  silkscreen extent -1.82,-1.45 1.54,0.89, body extent -1.45,-1.41 1.45,1.41, height 1.6
SW-TH_EC12D1524403 [mm]
  rrect100% 2.9x3.2 hole 2.3 slot 2.05 at 0 deg: 6(-5.79,-1.35) 7(5.46,-1.35)
  round 1.7 hole 1.05: A(-5.71,2.8) B(5.39,2.8) C(-5.71,-5.5) D(5.79,-4.8) E(-0.16,5.5)
  silkscreen extent -6.44,-7.23 6.08,4.5, body extent -6.38,-7.25 6.12,5.55, height 17.5
SW-TH_SK13D07VG4 [mil]
  round 60 hole 36: 1(-157.48,0) 3(0,0) 4(78.74,0) 5(157.48,0)
  rrect100% 55.12x86.61 hole 62.99 slot 31.5 at 0 deg: 6(242.13,0) 7(-242.13,0)
  silkscreen extent -271,-254 252,89, body extent -248,-244 248,87, height 185
SW_Cherry_MX_PCB_1.00u [mm]
  round 2.5 hole 1.5: 1(-3.81,2.54) 2(2.54,5.08)
  round 4 hole 4: Un1(0,0)
  round 1.75 hole 1.75: Un2(-5.08,0) Un3(5.08,0)
  silkscreen extent -7.1,-7.1 7.1,7.1, body extent -7.81,-7.81 7.79,7.79, height 15.44
TF-SMD_TF-015 [mm]
  rect 0.7x2 smd: 1(2.3,5.09) 2(1.21,5.09) 3(0.11,5.09) 4(-0.99,5.09) 5(-2.09,5.09) 6(-3.18,5.09) 7(-4.28,5.09) 8(-5.38,5.09) 9(-6.48,5.1)
  rect 1.2x1.397 smd: 10(-7.76,4.56)
  rect 1.27x2.286 smd: 11(-7.73,-5.1) 12(7.76,-5.09)
  rect 1.778x1.397 smd: 13(7,4.56)
  round 1 hole 1: Un1(-4.9,-5.51) Un2(3.1,-5.5)
  silkscreen extent -7.3,-9.55 8.02,5.58, body extent -7.94,-9.46 8.06,5.79, height 2
TSSOP-20_L6.5-W4.4-P0.65-LS6.4-BL [mm]
  rrect100% 0.364x1.742 smd: 1(-2.93,-2.87) 2(-2.28,-2.87) 3(-1.63,-2.87) 4(-0.98,-2.87) 5(-0.32,-2.87) 6(0.33,-2.87) 7(0.98,-2.87) 8(1.63,-2.87) 9(2.28,-2.87) 10(2.93,-2.87) 11(2.93,2.87) 12(2.28,2.87) 13(1.63,2.87) 14(0.98,2.87) 15(0.33,2.87) 16(-0.32,2.87) 17(-0.98,2.87) 18(-1.63,2.87) 19(-2.28,2.87) 20(-2.93,2.87)
  silkscreen extent -3.71,-3.23 3.33,1.77, body extent -3.25,-3.2 3.25,3.2, height 1.03
USB-C-SMD_MC-311D [mm]
  rrect100% 1x2.1 hole 1.7 slot 0.6 at 0 deg: 1(-4.32,1.8) 4(4.32,1.8)
  rrect100% 1x1.8 hole 1.4 slot 0.6 at 0 deg: 2(-4.32,-2.38) 3(4.32,-2.38)
  rect 0.6x1.15 smd: A1-B12(-3.2,2.38) A4-B9(-2.4,2.38) B1-A12(3.2,2.38) B4-A9(2.4,2.38)
  rect 0.3x1.15 smd: A5(-1.25,2.38) A6(-0.25,2.38) A7(0.25,2.38) A8(1.25,2.38) B5(1.75,2.38) B6(0.75,2.38) B7(-0.75,2.38) B8(-1.75,2.38)
  round 0.65 hole 0.65: Un1(2.89,1.3) Un2(-2.89,1.3)
  silkscreen extent -4.57,-5.07 4.57,2.86, body extent -4.47,-4.97 4.47,2.93, height 3.25
WQFN-24_L4.0-W4.0-P0.50-TL-EP2.7 [mm]
  rect 0.85x0.25 smd: 1(-2.03,1.25) 2(-2.03,0.75) 3(-2.03,0.25) 4(-2.03,-0.25) 5(-2.03,-0.75) 6(-2.03,-1.25) 13(2.03,-1.25) 14(2.03,-0.75) 15(2.03,-0.25) 16(2.03,0.25) 17(2.03,0.75) 18(2.03,1.25)
  rect 0.25x0.85 smd: 7(-1.25,-2.03) 8(-0.75,-2.03) 9(-0.25,-2.03) 10(0.25,-2.03) 11(0.75,-2.03) 12(1.25,-2.03) 19(1.25,2.03) 20(0.75,2.03) 21(0.25,2.03) 22(-0.25,2.03) 23(-0.75,2.03) 24(-1.25,2.03)
  rect 2.7x2.7 smd: 25(0,0)
  silkscreen extent -2.66,-2.16 2.14,2.14, body extent -2,-2 2,2, height 0.73

## Part data
*: LCSC Part=C5248080, Manufacturer=HS(汉昇), ki_keywords="OLED Displays Modules", MPN=HS96L03W2C03, Supplier=https://www.lcsc.com/datasheet/C5248080.pdf
*: LCSC Part=C7519, Manufacturer=ST(意法半导体), ki_description=USBLC6-2SC6, ki_keywords="ESD Protection Devices", MPN=USBLC6-2SC6, Supplier=https://lcsc.com/product-detail/Diodes-ESD_STMicroelectronics_USBLC6-2SC6_USBLC6-2SC6_C7519.html
* *: LCSC Part=C25905, Manufacturer=UNI-ROYAL(厚声), ki_description="5.1KΩ (5101) ±1%", ki_keywords=Resistors, MPN=0402WGF5101TCE, Supplier=https://lcsc.com/product-detail/Chip-Resistor-Surface-Mount-UniOhm_5-1KR-5101-1_C25905.html
* *: LCSC Part=C49326201, Manufacturer=Megastar(兆星), MPN=ZX-PM2.54-2-20PWS, Supplier=https://www.lcsc.com/datasheet/C49326201.pdf
*: LCSC Part=C2881910, Manufacturer="XKB Connection(中国星坤)", MPN=X1321WVS-2x05J-C40D53, ki_keywords="Pin Headers", Supplier=https://www.lcsc.com/datasheet/C2881910.pdf
*: LCSC Part=C2681581, Manufacturer="SHOU HAN(首韩)", ki_keywords="Slide Switches", MPN=SK13D07VG4, Supplier=https://www.lcsc.com/datasheet/C2681581.pdf
*: LCSC Part=C5184243, Manufacturer=GCT, MPN=USB4105-GF-A-120, Supplier=https://www.lcsc.com/datasheet/C5184243.pdf
*: LCSC Part=C6776948, Manufacturer=TERMINUS(汤铭科技), ki_keywords="USB ICs", MPN=FE1.1S-BQFN24B, Supplier=https://www.lcsc.com/datasheet/C6776948.pdf
*: LCSC Part=C5122332, Manufacturer=WCH(南京沁恒), ki_keywords="USB ICs", MPN=CH347T, Supplier=https://www.lcsc.com/datasheet/C5122332.pdf
*: LCSC Part=C157932, Manufacturer=JST, ki_keywords="Wire To Board / Wire To Wire Connector", MPN=S2B-PH-K-S-GW, Supplier=https://lcsc.com/product-detail/PH-Connectors_JST_S2B-PH-K-S-GW_PHsocket-1-2P-Curved-needle-pitch2mm_C157932.html
*: LCSC Part=C3036461, Manufacturer=x-powers(芯智汇), ki_keywords="Microcontroller Units (MCUs/MPUs/SOCs)", MPN=AXP2101, Supplier=https://www.lcsc.com/datasheet/C3036461.pdf
*: LCSC Part=C112349, Manufacturer=ALPSALPINE(阿尔卑斯阿尔派), ki_keywords="Rotary Encoders", MPN=EC12D1524403, Supplier=https://lcsc.com/product-detail/Coded-Rotary-Switches_ALPS_EC12D1524403_EC12D1524403_C112349.html
*: LCSC Part=C113206, Manufacturer=SOFNG(硕方), ki_keywords="SIM Card Connectors", MPN=TF-015, Supplier=https://lcsc.com/product-detail/Card-Sockets_TF-015_C113206.html
*: LCSC Part=C5333729, Manufacturer=Apmemory, MPN=APS6404L-3SQR-SN, ki_keywords=DRAM, Supplier=https://www.lcsc.com/datasheet/C5333729.pdf
*: LCSC Part=C5383163, Manufacturer=HCI(杭晶), ki_keywords=Oscillators, MPN=1532H4-12000JWPDTSNL, Supplier=https://www.lcsc.com/datasheet/C5383163.pdf
D1 D2 D3 D4 D5 D6 D7 D8 D9 D10 D11 D12 D13 D14 D15 D16 D17 D18 D19 D20 D21 D22 D23 D24 D25 D26 D27 D28 D29 D30 D31 D32 D33 D34 D35 D36 D37 D38 D39 D40 D41 D42 D43 D44 D45 D46 D47 D48 D49 D50 D51 D52 D53 D54 D55 D56 D57 D58 D59 D60 D61 D62 D63 D64 D65 D66 D67 D68 D69 D70 D71 D72 D73 D74 D75 D76 D77 D78 D79 D80 D81: library part CMP-2000-04932-2, "Fast Switching Diode, 100 V, 0.15 A, -65 to 150 degC, 2-Pin?SOD123, RoHS, Tape and Reel", If - Forward Current=0.15A, Ir - Reverse Current=1uA, Manufacturer=DiodesIncorporated, Max Surge Current=2A, Maximum Operating Temperature=+150C, Minimum Operating Temperature=-65C, Operating Temperature Range=-65Cto+150C, Package / Case=SOD-123, Package Reference=SOD123-2, Peak Reverse Voltage=100V, Vf - Forward Voltage=1.25V, Brand=DiodesIncorporated, Configuration=Single, Datasheet URL=http://www.farnell.com/datasheets/1915529.pdf, Datasheet Version="Rev. 24-2, 10/2013", Factory Pack Quantity=3000, Height=1.25mm, Length=2.85mm, Manufacturer URL=http://www.diodes.com/, Mounting Style=SMD/SMT, Package URL=http://www.diodes.com/datasheets/ds18004.pdf, Packaging=Reel, Product=SwitchingDiodes, Product Category=Diodes-GeneralPurpose,Power,Switching, Recovery Time=4ns, RoHS=True, Series=1N4148, Type=SwitchingDiode, Unit Weight=0.000353oz, Width=1.7mm
M?: "Nordic  nRF54L15 - BLE module"
U1: LCSC Part=C1521614, Manufacturer=LATTICE(莱迪思), MPN=LFE5U-25F-6BG256C, ki_keywords=CPLD/FPGA, Supplier=https://www.lcsc.com/datasheet/C1521614.pdf

## Nets (pads, with @x,y where several pads share a name; then routed paths per layer and width w, separated by ;. In a path a pad name is that pad's centre, name@x,y a point inside that pad or via, vN(x,y) a via of type N, cw(c..) or ccw(c..) an arc to the next point about the centre after c; other vN are vias at no path point)
"BLYST_L15_USB D+": *.10@280.16,127.25
"BLYST_L15_USB D-": *.9@280.16,126.75
CH347T_UD+: *.12@280.16,128.25 *.17@289.89,127.98
CH347T_UD-: *.11@280.16,127.75 *.16@289.89,127.32
COL0: SW1.1 SW14.1 SW29.1 SW44.1 SW58.1 SW72.1 | length 108.9
  Bottom Layer w0.254: SW1.1 SW14.1 10.477,78.74 SW29.1 15.24,57.309 SW44.1 17.621,40.64 SW58.1 22.384,26.352 SW72.1
COL1: SW2.1 SW15.1 SW30.1 SW45.1 SW59.1 SW73.1 | length 120.5
  Bottom Layer w0.254: SW2.1 SW15.1 29.527,83.502 SW30.1 39.052,59.69 SW45.1@43.798,54.945 ; SW73.1 36.671,17.621 41.91,22.86 48.26,22.86 53.34,27.94 SW59.1 43.815,45.402 SW45.1
COL2: SW3.1 SW16.1 SW31.1 SW46.1 SW60.1 SW74.1 | length 114.8
  Bottom Layer w0.254: SW3.1 SW16.1 48.578,89.535 58.102,80.01 58.102,65.722 62.865,60.96 62.865,51.435 72.39,41.91 SW60.1 72.39,28.734 SW74.1
COL3: SW4.1 SW17.1 SW32.1 SW47.1 SW61.1 | length 90.8
  Bottom Layer w0.254: SW4.1 SW17.1 67.627,86.042 77.153,76.517 SW32.1 77.153,62.547 81.915,57.785 81.915,48.895 91.44,39.37 SW61.1
COL4: SW5.1 SW18.1 SW33.1 SW48.1 SW62.1 | length 90.8
  Bottom Layer w0.254: SW5.1 SW18.1 86.677,86.042 96.203,76.517 96.203,62.547 100.965,57.785 100.965,48.895 110.49,39.37 SW62.1
COL5: SW6.1 SW19.1 SW34.1 SW49.1 SW63.1 SW75.1 | length 110.9
  Bottom Layer w0.254: SW6.1 SW19.1 105.727,86.042 115.252,76.517 115.252,63.817 120.015,59.055 SW49.1 120.65,54.292 120.65,46.99 129.54,38.1 129.54,21.59 131.921,19.209 SW75.1
COL6: SW7.1 SW20.1 SW35.1 SW50.1 SW64.1 | length 91.1
  Bottom Layer w0.254: SW7.1 SW20.1 124.777,86.042 134.302,76.517 134.302,62.547 139.065,57.785 139.065,47.625 148.59,38.1 SW64.1@148.59,35.56
COL7: SW8.1 SW21.1 SW36.1 SW51.1 SW65.1 | length 90.8
  Bottom Layer w0.254: SW8.1 SW21.1 143.827,86.042 153.352,76.517 153.352,62.547 158.115,57.785 158.115,47.625 167.64,38.1 SW65.1
COL8: SW9.1 SW22.1 SW37.1 SW52.1 SW66.1 | length 89.9
  Bottom Layer w0.254: SW9.1 SW22.1 162.877,84.772 172.403,75.248 172.403,61.277 177.165,56.515 177.165,46.355 SW66.1@186.69,36.83
COL10: SW11.1 SW24.1 SW39.1 SW54.1 SW68.1 SW77.1 | length 111.8
  Bottom Layer w0.254: SW11.1 SW24.1 200.977,84.772 210.502,75.248 210.502,62.547 215.265,57.785 215.265,46.355 224.79,36.83 224.79,29.21 220.028,24.447 SW77.1
COL11: SW12.1 SW25.1 SW40.1 SW55.1 SW78.1 | length 107.9
  Bottom Layer w0.254: SW12.1 SW25.1 220.028,84.772 229.552,75.248 229.552,59.69 SW55.1 234.315,40.005 239.077,35.242 SW78.1
COL12: SW13.1 SW26.1 SW41.1 SW69.1 SW79.1 | length 107.9
  Bottom Layer w0.254: SW13.1 SW26.1 239.077,83.502 SW41.1 248.92,73.66 248.92,37.941 SW69.1 250.984,23.971 SW79.1
COL13: SW27.1 SW42.1 SW56.1 SW70.1 SW80.1 | length 86.1
  Bottom Layer w0.254: SW27.1 267.652,78.74 SW42.1 272.415,65.405 265.271,58.261 265.271,47.784 SW70.1 SW80.1
COL14: SW28.1 SW43.1 SW57.1 SW71.1 SW81.1 | length 76
  Bottom Layer w0.254: SW81.1@296.227,17.012 SW71.1 SW43.1 SW28.1
GND: *.1@275.59,130.396 *.1@280.67,130.396 *.1@282.45,134.09 *.2@282.45,138.27 *.3@273.81,138.27 *.4@273.81,134.09 *.18@289.89,128.63 *.25@278.13,127 *.A1-B12 *.B1-A12
Net*_2: *.2@275.59,131.256 *.B5
NetD1_1: D1.1 SW1.2 | length 7
  Top Layer w0.254: SW1.2 D1.1@23.807,119.38
NetD2_1: D2.1 SW2.2 | length 7
  Top Layer w0.254: SW2.2 D2.1@42.857,119.38
NetD3_1: D3.1 SW3.2 | length 7
  Top Layer w0.254: SW3.2 D3.1@61.907,119.38
NetD4_1: D4.1 SW4.2 | length 7
  Top Layer w0.254: SW4.2 D4.1@80.957,119.38
NetD5_1: D5.1 SW5.2 | length 7
  Top Layer w0.254: SW5.2 D5.1@100.007,119.38
NetD6_1: D6.1 SW6.2 | length 6.7
  Top Layer w0.254: SW6.2 D6.1@118.745,119.38
NetD7_1: D7.1 SW7.2 | length 7
  Top Layer w0.254: SW7.2 D7.1@138.107,119.38
NetD8_1: D8.1 SW8.2 | length 6.7
  Top Layer w0.254: SW8.2 D8.1@156.845,119.38
NetD9_1: D9.1 SW9.2 | length 7
  Top Layer w0.254: SW9.2 D9.1@176.207,119.38
NetD10_1: D10.1 SW10.2 | length 7
  Top Layer w0.254: SW10.2 D10.1@195.257,119.38
NetD11_1: D11.1 SW11.2 | length 7
  Top Layer w0.254: SW11.2 D11.1@214.307,119.38
NetD12_1: D12.1 SW12.2 | length 7
  Top Layer w0.254: SW12.2 D12.1@233.357,119.38
NetD13_1: D13.1 SW13.2 | length 7
  Top Layer w0.254: SW13.2 D13.1@252.407,119.38
NetD14_1: D14.1 SW14.2 | length 6.7
  Top Layer w0.254: SW14.2 D14.1@23.495,95.567
NetD15_1: D15.1 SW15.2 | length 6.7
  Top Layer w0.254: SW15.2 D15.1@42.545,95.567
NetD16_1: D16.1 SW16.2 | length 6.9
  Top Layer w0.254: SW16.2 D16.1@61.855,95.567
NetD17_1: D17.1 SW17.2 | length 6.9
  Top Layer w0.254: SW17.2 D17.1@80.905,95.567
NetD18_1: D18.1 SW18.2 | length 6.9
  Top Layer w0.254: SW18.2 D18.1@99.955,95.567
NetD19_1: D19.1 SW19.2 | length 6.9
  Top Layer w0.254: SW19.2 D19.1@119.005,95.567
NetD20_1: D20.1 SW20.2 | length 6.9
  Top Layer w0.254: SW20.2 D20.1@138.055,95.567
NetD21_1: D21.1 SW21.2 | length 6.9
  Top Layer w0.254: SW21.2 D21.1@157.105,95.567
NetD22_1: D22.1 SW22.2 | length 6.9
  Top Layer w0.254: SW22.2 D22.1@176.155,95.567
NetD23_1: D23.1 SW23.2 | length 6.9
  Top Layer w0.254: SW23.2 D23.1@195.205,95.567
NetD24_1: D24.1 SW24.2 | length 6.9
  Top Layer w0.254: SW24.2 D24.1@214.255,95.567
NetD25_1: D25.1 SW25.2 | length 6.9
  Top Layer w0.254: SW25.2 D25.1@233.305,95.567
NetD26_1: D26.1 SW26.2 | length 6.9
  Top Layer w0.254: SW26.2 D26.1@252.355,95.567
NetD27_1: D27.1 SW27.2 | length 14.2
  Top Layer w0.254: SW27.2 280.93,95.567 D27.1@288.232,95.567
NetD28_1: D28.1 SW28.2 | length 6.9
  Top Layer w0.254: SW28.2 D28.1@309.505,95.567
NetD29_1: D29.1 SW29.2 | length 6.9
  Top Layer w0.254: SW29.2 D29.1@28.467,76.517
NetD30_1: D30.1 SW30.2 | length 6.9
  Top Layer w0.254: SW30.2 D30.1@52.28,76.517
NetD31_1: D31.1 SW31.2 | length 6.9
  Top Layer w0.254: SW31.2 D31.1@71.33,76.517
NetD32_1: D32.1 SW32.2 | length 6.9
  Top Layer w0.254: SW32.2 D32.1@90.38,76.517
NetD33_1: D33.1 SW33.2 | length 6.9
  Top Layer w0.254: SW33.2 D33.1@109.43,76.517
NetD34_1: D34.1 SW34.2 | length 6.9
  Top Layer w0.254: SW34.2 D34.1@128.48,76.517
NetD35_1: D35.1 SW35.2 | length 6.9
  Top Layer w0.254: SW35.2 D35.1@147.53,76.517
NetD36_1: D36.1 SW36.2 | length 6.9
  Top Layer w0.254: SW36.2 D36.1@166.58,76.517
NetD37_1: D37.1 SW37.2 | length 6.9
  Top Layer w0.254: SW37.2 D37.1@185.63,76.517
NetD38_1: D38.1 SW38.2 | length 6.9
  Top Layer w0.254: SW38.2 D38.1@204.68,76.517
NetD39_1: D39.1 SW39.2 | length 6.9
  Top Layer w0.254: SW39.2 D39.1@223.73,76.517
NetD40_1: D40.1 SW40.2 | length 7
  Top Layer w0.254: SW40.2 236.01,76.625 D40.1
NetD41_1: D41.1 SW41.2 | length 6.9
  Top Layer w0.254: SW41.2 D41.1@261.83,76.517
NetD42_1: D42.1 SW42.2 | length 6.9
  Top Layer w0.254: SW42.2 D42.1@285.642,76.517
NetD43_1: D43.1 SW43.2 | length 7
  Top Layer w0.254: SW43.2 309.455,76.517 D43.1
NetD44_1: D44.1 SW44.2 | length 6.9
  Top Layer w0.254: SW44.2 D44.1@30.864,57.468
NetD45_1: D45.1 SW45.2 | length 7
  Top Layer w0.254: SW45.2 50.258,57.375 D45.1
NetD46_1: D46.1 SW46.2 | length 7
  Top Layer w0.254: SW46.2 76.107,57.468 D46.1
NetD47_1: D47.1 SW47.2 | length 7.2
  Top Layer w0.254: SW47.2@88.106,57.15 88.331,57.375 D47.1
NetD48_1: D48.1 SW48.2 | length 6.9
  Top Layer w0.254: SW48.2@107.408,57.375 D48.1
NetD49_1: D49.1 SW49.2 | length 6.9
  Top Layer w0.254: SW49.2@126.458,57.375 D49.1
NetD50_1: D50.1 SW50.2 | length 6.9
  Top Layer w0.254: SW50.2@145.508,57.375 D50.1
NetD51_1: D51.1 SW51.2 | length 6.9
  Top Layer w0.254: SW51.2 D51.1@171.357,57.468
NetD52_1: D52.1 SW52.2 | length 7
  Top Layer w0.254: SW52.2 190.407,57.468 D52.1
NetD53_1: D53.1 SW53.2 | length 7
  Top Layer w0.254: SW53.2 209.457,57.468 D53.1
NetD54_1: D54.1 SW54.2 | length 6.9
  Top Layer w0.254: SW54.2@221.708,57.375 D54.1
NetD55_1: D55.1 SW55.2 | length 6.9
  Top Layer w0.254: SW55.2 D55.1@247.557,57.468
NetD56_1: D56.1 SW56.2 | length 6.9
  Top Layer w0.254: SW56.2@271.714,57.375 278.606,57.375
NetD57_1: D57.1 SW57.2 | length 6.9
  Top Layer w0.254: SW57.2 D57.1@309.47,57.468
NetD58_1: D58.1 SW58.2 | length 6.9
  Top Layer w0.254: SW58.2 35.676,38.417
NetD59_1: D59.1 SW59.2 | length 6.9
  Top Layer w0.254: SW59.2 D59.1@66.632,38.417
NetD60_1: D60.1 SW60.2
NetD61_1: D61.1 SW61.2 | length 0.1
  Top Layer w0.254: SW61.2 SW61.2@97.833,38.375
NetD62_1: D62.1 SW62.2 | length 6.9
  Top Layer w0.254: SW62.2 D62.1@123.782,38.417
NetD63_1: D63.1 SW63.2 | length 6.9
  Top Layer w0.254: SW63.2 D63.1@142.832,38.417
NetD64_1: D64.1 SW64.2 | length 7
  Top Layer w0.254: SW64.2@154.983,38.375 SW64.2 D64.1@161.882,38.417
NetD65_1: D65.1 SW65.2 | length 7
  Top Layer w0.254: SW65.2 174.033,38.375 D65.1
NetD66_1: D66.1 SW66.2 | length 6.7
  Top Layer w0.254: SW66.2 D66.1@199.707,38.417
NetD67_1: D67.1 SW67.2 | length 7
  Top Layer w0.254: SW67.2 219.032,38.417 D67.1
NetD68_1: D68.1 SW68.2 | length 6.9
  Top Layer w0.254: SW68.2 D68.1@238.082,38.417
NetD69_1: D69.1 SW69.2 | length 6.9
  Top Layer w0.254: SW69.2@257.376,38.375 D69.1
NetD70_1: D70.1 SW70.2 | length 6.7
  Top Layer w0.254: SW70.2 D70.1@290.195,38.417
NetD71_1: D71.1 SW71.2 | length 7
  Top Layer w0.254: SW71.2 309.52,38.417 D71.1
NetD72_1: D72.1 SW72.2 | length 9.8
  Top Layer w0.254: SW72.2 D72.1@28.568,19.367 ; D72.1@28.258,19.367 D72.1@28.575,19.05
NetD73_1: D73.1 SW73.2 | length 9.4
  Top Layer w0.254: SW73.2 D73.1@52.38,19.367
NetD74_1: D74.1 SW74.2 | length 9.4
  Top Layer w0.254: SW74.2 D74.1@76.193,19.367
NetD75_1: D75.1 SW75.2 | length 7
  Top Layer w0.254: SW75.2 D75.1@145.249,19.367
NetD76_1: D76.1 SW76.2 | length 7
  Top Layer w0.254: SW76.2 D76.1@214.305,19.367
NetD77_1: D77.1 SW77.2 | length 7
  Top Layer w0.254: SW77.2 226.385,19.375 D77.1
NetD78_1: D78.1 SW78.2 | length 7
  Top Layer w0.254: SW78.2 D78.1@252.405,19.367
NetD79_1: D79.1 SW79.2 | length 7
  Top Layer w0.254: SW79.2 D79.1@271.455,19.367
NetD80_1: D80.1 SW80.2 | length 7
  Top Layer w0.254: SW80.2 D80.1@290.505,19.367
NetD81_1: D81.1 SW81.2 | length 7
  Top Layer w0.254: SW81.2 D81.1@309.555,19.367
NetSW10_1: SW10.1 SW23.1 SW38.1 SW53.1 SW67.1 SW76.1 | length 111.8
  Bottom Layer w0.254: SW10.1 SW23.1 181.927,84.772 191.452,75.248 191.452,61.278 196.215,56.515 196.215,46.355 205.74,36.83 205.74,24.13 200.977,19.367 SW76.1
ROW0: D1.2 D2.2 D3.2 D4.2 D5.2 D6.2 D7.2 D8.2 D9.2 D10.2 D11.2 D12.2 D13.2 | length 228.6
  Top Layer w0.254: D1.2 D2.2 D4.2 D6.2 D8.2 D10.2 D12.2 D13.2
ROW1: D14.2 D15.2 D16.2 D17.2 D18.2 D19.2 D20.2 D21.2 D22.2 D23.2 D24.2 D25.2 D26.2 D27.2 D28.2 | length 288.1
  Top Layer w0.254: D14.2 D15.2 D16.2 D17.2 D18.2 D19.2 D20.2 D21.2 D22.2 D23.2 D24.2 D25.2 D26.2 256.255,98.775 257.81,100.33 261.62,100.33 262.89,99.06 279.4,99.06 280.67,100.33 281.94,100.33 287.02,100.33 288.575,98.775 D28.2
ROW2: D29.2 D30.2 D31.2 D32.2 D33.2 D34.2 D35.2 D36.2 D37.2 D38.2 D39.2 D40.2 D41.2 D42.2 D43.2 | length 281
  Top Layer w0.254: D29.2 D31.2 D32.2 D34.2 D35.2 D36.2 D37.2 D39.2 D41.2 D43.2
ROW3: D44.2 D45.2 D46.2 D47.2 D48.2 D49.2 D50.2 D51.2 D52.2 D53.2 D54.2 D55.2 D56.2 D57.2 | length 280
  Top Layer w0.254: D44.2 D45.2 D46.2 D47.2 D48.2 D49.2 D50.2 D51.2 D52.2 D53.2 D54.2 D55.2 251.025,60.525 252.73,62.23 285.75,62.23 287.455,60.525 D56.2 D57.2
ROW4: D58.2 D59.2 D60.2 D61.2 D62.2 D63.2 D64.2 D65.2 D66.2 D67.2 D68.2 D69.2 D70.2 D71.2 | length 266.4
  Top Layer w0.254: D58.2 D59.2 D60.2 D61.2 D62.2 D63.2 D64.2 D65.2 D66.2 D67.2 D68.2 D69.2 D70.2 D71.2
ROW5: D72.2 D73.2 D74.2 D75.2 D76.2 D77.2 D78.2 D79.2 D80.2 D81.2 | length 281
  Top Layer w0.254: D72.2 D73.2 D74.2 D75.2 D76.2 D77.2 D78.2 D79.2 D80.2 D81.2
USB_DN: *.14@278.88,129.03 *.A7 *.B7
USB_DP: *.15@278.38,129.03 *.A6 *.B6
VBUS: *.19@276.1,128.25
VBUS_RAW: *.A4-B9 *.B4-A9
pads on no net: *.1@21.59,130.13 *.1@96.52,132.08 *.1@208.28,132.08 *.1@260.59,126.99 *.1@261.23,103.04 *.1@276.88,124.97 *.1@284.15,129.93 *.1@285.69,111.12 *.1@285.75,152.4 *.1@293.387,128.8 *.1@296.1,134.62 *.1@304.8,126 *.1@318.65,4.13 *.2@21.59,134.03 *.2@96.52,129.54 *.2@208.28,129.54 *.2@261.23,105.24 *.2@261.68,126.99 *.2@277.38,124.97 *.2@280.67,131.256 *.2@283.21,152.4 *.2@284.15,129.28 *.2@285.69,109.85 *.2@293.387,128.4 *.2@304.8,128 *.2@318.65,5.08 *.3@22.86,130.13 *.3@93.98,132.08 *.3@205.74,132.08 *.3@259.47,105.24 *.3@262.78,126.99 *.3@277.88,124.97 *.3@280.67,152.4 *.3@284.15,128.63 *.3@285.69,108.59 *.3@292.1,134.62 *.3@293.387,128 *.3@318.65,6.03 *.4@22.86,134.03 *.4@93.98,129.54 *.4@205.74,129.54 *.4@259.47,103.04 *.4@263.88,126.99 *.4@278.13,152.4 *.4@278.38,124.97 *.4@284.15,127.98 *.4@285.69,107.32 *.4@290.1,134.62 *.4@293.387,127.6 *.4@316.35,6.03 *.5 *.6 *.7 *.8 *.9@26.67,130.13 *.9@86.36,132.08 *.9@198.12,132.08 *.9@269.37,126.98 *.9@284.15,124.72 *.9@293.387,125.6 *.10@26.67,134.03 *.10@86.36,129.54 *.10@198.12,129.54 *.10@270.65,127.52 *.10@284.15,124.07 *.10@293.387,125.2 *.11@83.82,132.08 *.11@195.58,132.08 *.11@270.62,137.18 *.11@289.89,124.07 *.11@294.087,124.5 *.12@83.82,129.54 *.12@195.58,129.54 *.12@255.13,137.17 *.12@289.89,124.72 *.12@294.487,124.5 *.13 *.14@81.28,129.54 *.14@193.04,129.54 *.14@289.89,126.02 *.14@295.287,124.5 *.15@78.74,132.08 *.15@190.5,132.08 *.15@289.89,126.67 *.15@295.687,124.5 *.16@78.74,129.54 *.16@190.5,129.54 *.16@277.88,129.03 *.16@296.087,124.5 *.17@76.2,132.08 *.17@187.96,132.08 *.17@277.38,129.03 *.17@296.487,124.5 *.18@76.2,129.54 *.18@187.96,129.54 *.18@276.88,129.03 *.18@296.887,124.5 *.19@73.66,132.08 *.19@185.42,132.08 *.19@289.89,129.28 *.19@297.287,124.5 *.20 *.21 *.22 *.23 *.24 *.25@66.04,132.08 *.25@177.8,132.08 *.25@298.387,126.8 *.26 *.27 *.28 *.29 *.30 *.31 *.32 *.33 *.34 *.35 *.36 *.37 *.38 *.39 *.40 *.41 *.A *.A5 *.A8 *.B *.B8 *.C *.D *.E *.Un1 *.Un2 M?.1 M?.2 M?.3 M?.4 M?.5 M?.6 M?.7 M?.8 M?.9 M?.10 M?.11 M?.12 M?.13 M?.14 M?.15 M?.16 M?.17 M?.18 M?.19 M?.20 M?.21 M?.22 M?.23 M?.24 M?.25 M?.26 M?.27 M?.28 M?.29 M?.30 M?.31 M?.32 M?.33 M?.34 M?.35 M?.36 SW1.Un1 SW1.Un2 SW1.Un3 SW2.Un1 SW2.Un2 SW2.Un3 SW3.Un1 SW3.Un2 SW3.Un3 SW4.Un1 SW4.Un2 SW4.Un3 SW5.Un1 SW5.Un2 SW5.Un3 SW6.Un1 SW6.Un2 SW6.Un3 SW7.Un1 SW7.Un2 SW7.Un3 SW8.Un1 SW8.Un2 SW8.Un3 SW9.Un1 SW9.Un2 SW9.Un3 SW10.Un1 SW10.Un2 SW10.Un3 SW11.Un1 SW11.Un2 SW11.Un3 SW12.Un1 SW12.Un2 SW12.Un3 SW13.Un1 SW13.Un2 SW13.Un3 SW14.Un1 SW14.Un2 SW14.Un3 SW15.Un1 SW15.Un2 SW15.Un3 SW16.Un1 SW16.Un2 SW16.Un3 SW17.Un1 SW17.Un2 SW17.Un3 SW18.Un1 SW18.Un2 SW18.Un3 SW19.Un1 SW19.Un2 SW19.Un3 SW20.Un1 SW20.Un2 SW20.Un3 SW21.Un1 SW21.Un2 SW21.Un3 SW22.Un1 SW22.Un2 SW22.Un3 SW23.Un1 SW23.Un2 SW23.Un3 SW24.Un1 SW24.Un2 SW24.Un3 SW25.Un1 SW25.Un2 SW25.Un3 SW26.Un1 SW26.Un2 SW26.Un3 SW27.Un1 SW27.Un2 SW27.Un3 SW28.Un1 SW28.Un2 SW28.Un3 SW29.Un1 SW29.Un2 SW29.Un3 SW30.Un1 SW30.Un2 SW30.Un3 SW31.Un1 SW31.Un2 SW31.Un3 SW32.Un1 SW32.Un2 SW32.Un3 SW33.Un1 SW33.Un2 SW33.Un3 SW34.Un1 SW34.Un2 SW34.Un3 SW35.Un1 SW35.Un2 SW35.Un3 SW36.Un1 SW36.Un2 SW36.Un3 SW37.Un1 SW37.Un2 SW37.Un3 SW38.Un1 SW38.Un2 SW38.Un3 SW39.Un1 SW39.Un2 SW39.Un3 SW40.Un1 SW40.Un2 SW40.Un3 SW41.Un1 SW41.Un2 SW41.Un3 SW42.Un1 SW42.Un2 SW42.Un3 SW43.Un1 SW43.Un2 SW43.Un3 SW44.Un1 SW44.Un2 SW44.Un3 SW45.Un1 SW45.Un2 SW45.Un3 SW46.Un1 SW46.Un2 SW46.Un3 SW47.Un1 SW47.Un2 SW47.Un3 SW48.Un1 SW48.Un2 SW48.Un3 SW49.Un1 SW49.Un2 SW49.Un3 SW50.Un1 SW50.Un2 SW50.Un3 SW51.Un1 SW51.Un2 SW51.Un3 SW52.Un1 SW52.Un2 SW52.Un3 SW53.Un1 SW53.Un2 SW53.Un3 SW54.Un1 SW54.Un2 SW54.Un3 SW55.Un1 SW55.Un2 SW55.Un3 SW56.Un1 SW56.Un2 SW56.Un3 SW57.Un1 SW57.Un2 SW57.Un3 SW58.Un1 SW58.Un2 SW58.Un3 SW59.Un1 SW59.Un2 SW59.Un3 SW60.Un1 SW60.Un2 SW60.Un3 SW61.Un1 SW61.Un2 SW61.Un3 SW62.Un1 SW62.Un2 SW62.Un3 SW63.Un1 SW63.Un2 SW63.Un3 SW64.Un1 SW64.Un2 SW64.Un3 SW65.Un1 SW65.Un2 SW65.Un3 SW66.Un1 SW66.Un2 SW66.Un3 SW67.Un1 SW67.Un2 SW67.Un3 SW68.Un1 SW68.Un2 SW68.Un3 SW69.Un1 SW69.Un2 SW69.Un3 SW70.Un1 SW70.Un2 SW70.Un3 SW71.Un1 SW71.Un2 SW71.Un3 SW72.Un1 SW72.Un2 SW72.Un3 SW73.Un1 SW73.Un2 SW73.Un3 SW74.Un1 SW74.Un2 SW74.Un3 SW75.Un1 SW75.Un2 SW75.Un3 SW76.Un1 SW76.Un2 SW76.Un3 SW77.Un1 SW77.Un2 SW77.Un3 SW78.Un1 SW78.Un2 SW78.Un3 SW79.Un1 SW79.Un2 SW79.Un3 SW80.Un1 SW80.Un2 SW80.Un3 SW81.Un1 SW81.Un2 SW81.Un3 U1.A1 U1.A2 U1.A3 U1.A4 U1.A5 U1.A6 U1.A7 U1.A8 U1.A9 U1.A10 U1.A11 U1.A12 U1.A13 U1.A14 U1.A15 U1.A16 U1.B1 U1.B2 U1.B3 U1.B4 U1.B5 U1.B6 U1.B7 U1.B8 U1.B9 U1.B10 U1.B11 U1.B12 U1.B13 U1.B14 U1.B15 U1.B16 U1.C1 U1.C2 U1.C3 U1.C4 U1.C5 U1.C6 U1.C7 U1.C8 U1.C9 U1.C10 U1.C11 U1.C12 U1.C13 U1.C14 U1.C15 U1.C16 U1.D1 U1.D2 U1.D3 U1.D4 U1.D5 U1.D6 U1.D7 U1.D8 U1.D9 U1.D10 U1.D11 U1.D12 U1.D13 U1.D14 U1.D15 U1.D16 U1.E1 U1.E2 U1.E3 U1.E4 U1.E5 U1.E6 U1.E7 U1.E8 U1.E9 U1.E10 U1.E11 U1.E12 U1.E13 U1.E14 U1.E15 U1.E16 U1.F1 U1.F2 U1.F3 U1.F4 U1.F5 U1.F6 U1.F7 U1.F8 U1.F9 U1.F10 U1.F11 U1.F12 U1.F13 U1.F14 U1.F15 U1.F16 U1.G1 U1.G2 U1.G3 U1.G4 U1.G5 U1.G6 U1.G7 U1.G8 U1.G9 U1.G10 U1.G11 U1.G12 U1.G13 U1.G14 U1.G15 U1.G16 U1.H1 U1.H2 U1.H3 U1.H4 U1.H5 U1.H6 U1.H7 U1.H8 U1.H9 U1.H10 U1.H11 U1.H12 U1.H13 U1.H14 U1.H15 U1.H16 U1.J1 U1.J2 U1.J3 U1.J4 U1.J5 U1.J6 U1.J7 U1.J8 U1.J9 U1.J10 U1.J11 U1.J12 U1.J13 U1.J14 U1.J15 U1.J16 U1.K1 U1.K2 U1.K3 U1.K4 U1.K5 U1.K6 U1.K7 U1.K8 U1.K9 U1.K10 U1.K11 U1.K12 U1.K13 U1.K14 U1.K15 U1.K16 U1.L1 U1.L2 U1.L3 U1.L4 U1.L5 U1.L6 U1.L7 U1.L8 U1.L9 U1.L10 U1.L11 U1.L12 U1.L13 U1.L14 U1.L15 U1.L16 U1.M1 U1.M2 U1.M3 U1.M4 U1.M5 U1.M6 U1.M7 U1.M8 U1.M9 U1.M10 U1.M11 U1.M12 U1.M13 U1.M14 U1.M15 U1.M16 U1.N1 U1.N2 U1.N3 U1.N4 U1.N5 U1.N6 U1.N7 U1.N8 U1.N9 U1.N10 U1.N11 U1.N12 U1.N13 U1.N14 U1.N15 U1.N16 U1.P1 U1.P2 U1.P3 U1.P4 U1.P5 U1.P6 U1.P7 U1.P8 U1.P9 U1.P10 U1.P11 U1.P12 U1.P13 U1.P14 U1.P15 U1.P16 U1.R1 U1.R2 U1.R3 U1.R4 U1.R5 U1.R6 U1.R7 U1.R8 U1.R9 U1.R10 U1.R11 U1.R12 U1.R13 U1.R14 U1.R15 U1.R16 U1.T1 U1.T2 U1.T3 U1.T4 U1.T5 U1.T6 U1.T7 U1.T8 U1.T9 U1.T10 U1.T11 U1.T12 U1.T13 U1.T14 U1.T15 U1.T16

## Text inside footprints (layer, text, board x,y; h text height)
M?: Top Overlay "KEEPOUT" at 125.72,136.9 h0.8; Top Overlay "ANT" at 127.495,138.15 h0.8